# Altium PCB PCB_Design.PcbDoc
Units mm, origin at the board's own origin, x right, y up, seen from the top; angles counter-clockwise.
Board outline 210 x 7 mm, 2 copper layers (Top Layer, Bottom Layer); 59 components, 51 nets, 211 pads, 38 vias.
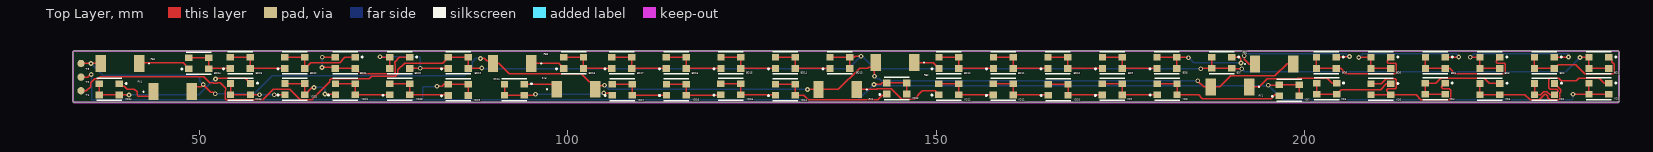
[diagram p0: Top Layer view]
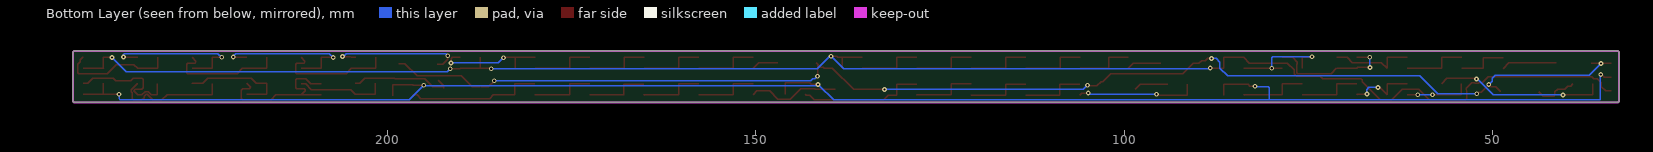
[diagram p1: Bottom Layer view, seen from below]
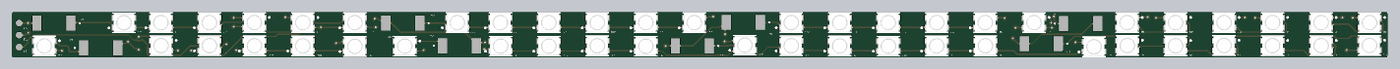
[diagram p2: 3D render of the assembled board from above, using the file's embedded part models]

## Layer stack, top to bottom
Top Solder: solder mask 0.0102, Solder Resist, Dk 3.5
Top Layer: signal copper 0.0356
Dielectric 1: dielectric 0.32, FR-4, Dk 4.8
Bottom Layer: signal copper 0.0356
Bottom Solder: solder mask 0.0102, Solder Resist, Dk 3.5

## Board outline
33.02,82.789 cw(c33.02,83.043) 32.766,83.043 32.766,89.535 cw(c33.02,89.535) 33.02,89.789 242.512,89.789 cw(c242.512,89.535) 242.766,89.535 242.766,83.043 cw(c242.512,83.043) 242.512,82.789

## Design rules (kind name [scope] priority, off if disabled: settings)
AcuteAngle [All] p1: minimum=6.00000000000000E+0001 checktracksonly=FALSE
BoardOutlineClearance "BoardOutlineClearance Overlay" [OnLayer('Top Overlay') or OnLayer('Bottom Overlay')] p1: gap=-2 ignorepadtopadclearanceinfootprint=FALSE
BoardOutlineClearance "BoardOutlineClearance general" [All] p2: gap=0.25 ignorepadtopadclearanceinfootprint=FALSE
Clearance "Clearance TS-LV without coating" [InNetClass('TS') vs InNetClass('LV')] p1 off: gap=20 ignorepadtopadclearanceinfootprint=TRUE except(0: Arc-Text Track-Text SMDPad-Text THPad-Text Via-Text Fill-Text Poly-Text Region-Text Text-Text Text-Hole) // without Conformal Coating (Rules 2023.1.0: EV 4.3.6)
Clearance "Clearance TS-LV" [InNetClass('TS') vs InNetClass('LV')] p2: gap=4.15 ignorepadtopadclearanceinfootprint=TRUE except(0: Arc-Text Track-Text SMDPad-Text THPad-Text Via-Text Fill-Text Poly-Text Region-Text Text-Text)
Clearance "Clearance TS-TS" [InNetClass('TS+') vs InNetClass('TS-')] p3: gap=3.15 ignorepadtopadclearanceinfootprint=TRUE except(0: Arc-Text Track-Text SMDPad-Text THPad-Text Via-Text Fill-Text Poly-Text Region-Text Text-Text)
Clearance "Clearance general" [All] p4: gap=0.15 ignorepadtopadclearanceinfootprint=TRUE except(0: Arc-Text Track-Text SMDPad-Text THPad-Text Via-Text Text-Text)
ComponentClearance [All] p1: gap=0.1 collisioncheckmode=3 verticalgap=1 showdistances=FALSE donotcheckwithout3dbody=TRUE
Creepage [InNetClass('TS') vs InNetClass('LV')] p1: checkdistance=5 applytopolygonpour=TRUE // Kriechstrecke
DiffPairsRouting [All] p1: maxlimit=0.5 minlimit=0.15 mostfreqgap=0.2 toplayer_minwidth=0.15 toplayer_maxwidth=0.5 toplayer_prefwidth=0.2 bottomlayer_minwidth=0.15 bottomlayer_maxwidth=0.5 bottomlayer_prefwidth=0.2 maxuncoupledlength=12.7
Height [All] p1: minheight=0 maxheight=100 prefheight=15
HoleSize [All] p1: absolutevalues=TRUE maxlimit=5 minlimit=0.25 maxpercent=80.000 minpercent=20.000
HoleToHoleClearance [All] p1: gap=0.5 allowstackedmicrovias=FALSE
MinimumAnnularRing [All] p1: minimumring=0.175
MinimumSolderMaskSliver [All] p1: minsoldermaskwidth=0.15
PasteMaskExpansion "PasteMaskExpansion THT" [OnMultiLayer] p1: expansion=-2539.975 usepaste=FALSE // THT-parts without paste
PasteMaskExpansion [All] p2: expansion=0 percent=10.000000
PlaneClearance [All] p1: clearance=0.5
PlaneConnect [All] p1: planeconnectstyle=Relief reliefexpansion=0.5 reliefentries=4 reliefconductorwidth=0.25 reliefairgap=0.15
PolygonConnect "PolygonConnect Stitching Via" [IsStitchingVia] p1: connectstyle=Direct reliefconductorwidth=0.254 reliefentries=4 polygonreliefangle="90 Angle" airgapwidth=0.254
PolygonConnect "PolygonConnect general" [All] p2: thpad.connectstyle=Relief thpad.reliefconductorwidth=0.25 thpad.reliefentries=4 thpad.polygonreliefangle="45 Angle" thpad.airgapwidth=0.2 smdpad.connectstyle=Relief smdpad.reliefconductorwidth=0.25 smdpad.reliefentries=4 smdpad.polygonreliefangle="90 Angle" smdpad.airgapwidth=0.2 via.connectstyle=Relief via.reliefconductorwidth=0.25 via.reliefentries=4 via.polygonreliefangle="45 Angle" via.airgapwidth=0.2
RoutingCorners [All] p1: cornerstyle=45-Degree minsetback=2.5 maxsetback=2.5
RoutingTopology "RoutingTopology Top" [OnLayer('Top Layer')] p1: topology=Vertical // Helplines top-layer
RoutingTopology "RoutingTopology Bottom" [OnLayer('Bottom Layer')] p2: topology=Horizontal // Helplines bottom-layer
RoutingVias "RoutingVias StitchingVias" [IsStitchingVia] p1: holewidth=0.3 width=0.65 viastyle="Through Hole" minholewidth=0.25 minwidth=0.6 maxholewidth=0.3 maxwidth=0.65
RoutingVias "RoutingVias general" [All] p2: holewidth=0.3 width=0.65 viastyle="Through Hole" minholewidth=0.25 minwidth=0.6 maxholewidth=0.6 maxwidth=0.85
SMDToCorner [All] p1: distance=39370
SilkToSilkClearance [All] p1: silktosilkclearance=0
SilkToSolderMaskClearance [IsPad] p1: minsilkscreentomaskgap=0.1 clearancetoexposedcopper=FALSE
SolderMaskExpansion "SolderMaskExpansion Vias" [IsVia] p1: expansion=0.1 istentingtop=TRUE // vias tented
SolderMaskExpansion "SolderMaskExpansion general" [All] p2: expansion=0.1 istentingtop=FALSE
SupplyNets "Schematic Supply Nets" [InNet('GND')] p1: voltage=0.000
UnRoutedNet [All] p1: checkbadconnections=TRUE
Width "Width Powerlane" [InNetClass('Power')] p1: maxlimit=5 minlimit=0.15 preferedwidth=0.5
Width "Width general" [All] p2: maxlimit=3 minlimit=0.15 preferedwidth=0.2
16 further rules are at their usual default settings.

## Components (designator, comment, footprint, x,y, rotation, side; value= is the part's Value field where it differs from the comment)
BD1 "Blue, 3.2V, 120°" "WL-SMTW_3528_LPCC 4" 240.03,88.16 r180 top
BD2 "Blue, 3.2V, 120°" "WL-SMTW_3528_LPCC 4" 232.627,88.16 r180 top
BD3 "Blue, 3.2V, 120°" "WL-SMTW_3528_LPCC 4" 225.224,88.16 r180 top
BD4 "Blue, 3.2V, 120°" "WL-SMTW_3528_LPCC 4" 217.821,88.16 r180 top
BD5 "Blue, 3.2V, 120°" "WL-SMTW_3528_LPCC 4" 210.417,88.16 r180 top
BD6 "Blue, 3.2V, 120°" "WL-SMTW_3528_LPCC 4" 203.014,88.16 r180 top
BD7 "Blue, 3.2V, 120°" "WL-SMTW_3528_LPCC 4" 188.798,88.163 r180 top
BD8 "Blue, 3.2V, 120°" "WL-SMTW_3528_LPCC 4" 181.355,88.16 r0 top
BD9 "Blue, 3.2V, 120°" "WL-SMTW_3528_LPCC 4" 173.952,88.16 r0 top
BD10 "Blue, 3.2V, 120°" "WL-SMTW_3528_LPCC 4" 166.548,88.16 r0 top
BD11 "Blue, 3.2V, 120°" "WL-SMTW_3528_LPCC 4" 159.145,88.16 r0 top
BD12 "Blue, 3.2V, 120°" "WL-SMTW_3528_LPCC 4" 151.742,88.16 r0 top
BD13 "Blue, 3.2V, 120°" "WL-SMTW_3528_LPCC 4" 136.936,88.16 r0 top
BD14 "Blue, 3.2V, 120°" "WL-SMTW_3528_LPCC 4" 129.533,88.16 r0 top
BD15 "Blue, 3.2V, 120°" "WL-SMTW_3528_LPCC 4" 122.13,88.16 r0 top
BD16 "Blue, 3.2V, 120°" "WL-SMTW_3528_LPCC 4" 114.726,88.16 r0 top
BD17 "Blue, 3.2V, 120°" "WL-SMTW_3528_LPCC 4" 107.323,88.16 r0 top
BD18 "Blue, 3.2V, 120°" "WL-SMTW_3528_LPCC 4" 100.758,88.16 r0 top
BD19 "Blue, 3.2V, 120°" "WL-SMTW_3528_LPCC 4" 85.114,88.16 r0 top
BD20 "Blue, 3.2V, 120°" "WL-SMTW_3528_LPCC 4" 77.161,88.16 r180 top
BD21 "Blue, 3.2V, 120°" "WL-SMTW_3528_LPCC 4" 69.757,88.16 r180 top
BD22 "Blue, 3.2V, 120°" "WL-SMTW_3528_LPCC 4" 62.904,88.16 r0 top
BD23 "Blue, 3.2V, 120°" "WL-SMTW_3528_LPCC 4" 55.501,88.16 r0 top
BD24 "Blue, 3.2V, 120°" "WL-SMTW_3528_LPCC 4" 49.86,88.138 r0 top
RB1 "Resistor" "2010 (5025)" 195.91,88.011 r0 top value=#NAME?
RB2 "Resistor" "2010 (5025)" 144.424,88.214 r180 top value=#NAME?
RB3 "Resistor" "2010 (5025)" 92.431,88.087 r180 top value=#NAME?
RB4 "Resistor" "2010 (5025)" 39.157,88.087 r180 top value=#NAME?
RY1 "Resistor" "2010 (5025)" 189.925,84.912 r180 top value=#NAME?
RY2 "Resistor" "2010 (5025)" 136.643,84.557 r180 top value=#NAME?
RY3 "Resistor" "2010 (5025)" 101.092,84.582 r0 top value=#NAME?
RY4 "Resistor" "2010 (5025)" 46.304,84.252 r0 top value=#NAME?
T1 "Testpoint_1" Testpoint_1mm 33.858,84.379 r0 top
T2 "Testpoint_2" Testpoint_1mm 33.858,86.233 r0 top
T3 "Testpoint_3" Testpoint_1mm 33.858,88.087 r0 top
YD1 "Yellow, 2.4V, 120°" "WL-SMTW_3528_LPCC 4" 240.026,84.645 r180 top
YD2 "Yellow, 2.4V, 120°" "WL-SMTW_3528_LPCC 4" 232.639,84.607 r180 top
YD3 "Yellow, 2.4V, 120°" "WL-SMTW_3528_LPCC 4" 225.222,84.607 r180 top
YD4 "Yellow, 2.4V, 120°" "WL-SMTW_3528_LPCC 4" 217.805,84.633 r180 top
YD5 "Yellow, 2.4V, 120°" "WL-SMTW_3528_LPCC 4" 210.414,84.582 r180 top
YD6 "Yellow, 2.4V, 120°" "WL-SMTW_3528_LPCC 4" 203.048,84.633 r180 top
YD7 "Yellow, 2.4V, 120°" "WL-SMTW_3528_LPCC 4" 197.968,84.43 r0 top
YD8 "Yellow, 2.4V, 120°" "WL-SMTW_3528_LPCC 4" 181.381,84.582 r0 top
YD9 "Yellow, 2.4V, 120°" "WL-SMTW_3528_LPCC 4" 173.939,84.557 r0 top
YD10 "Yellow, 2.4V, 120°" "WL-SMTW_3528_LPCC 4" 166.573,84.531 r0 top
YD11 "Yellow, 2.4V, 120°" "WL-SMTW_3528_LPCC 4" 159.131,84.557 r0 top
YD12 "Yellow, 2.4V, 120°" "WL-SMTW_3528_LPCC 4" 151.736,84.595 r0 top
YD13 "Yellow, 2.4V, 120°" "WL-SMTW_3528_LPCC 4" 144.653,84.684 r0 top
YD14 "Yellow, 2.4V, 120°" "WL-SMTW_3528_LPCC 4" 129.536,84.519 r0 top
YD15 "Yellow, 2.4V, 120°" "WL-SMTW_3528_LPCC 4" 122.123,84.582 r0 top
YD16 "Yellow, 2.4V, 120°" "WL-SMTW_3528_LPCC 4" 114.732,84.531 r0 top
YD17 "Yellow, 2.4V, 120°" "WL-SMTW_3528_LPCC 4" 107.366,84.531 r0 top
YD18 "Yellow, 2.4V, 120°" "WL-SMTW_3528_LPCC 4" 92.735,84.531 r180 top
YD19 "Yellow, 2.4V, 120°" "WL-SMTW_3528_LPCC 4" 85.112,84.492 r0 top
YD20 "Yellow, 2.4V, 120°" "WL-SMTW_3528_LPCC 4" 77.161,84.57 r0 top
YD21 "Yellow, 2.4V, 120°" "WL-SMTW_3528_LPCC 4" 69.774,84.582 r0 top
YD22 "Yellow, 2.4V, 120°" "WL-SMTW_3528_LPCC 4" 62.916,84.607 r0 top
YD23 "Yellow, 2.4V, 120°" "WL-SMTW_3528_LPCC 4" 55.524,84.607 r180 top
YD24 "Yellow, 2.4V, 120°" "WL-SMTW_3528_LPCC 4" 37.694,84.557 r180 top

## Footprints (in the part's own frame and the unit in brackets; to place one, negate y for a bottom-side part, rotate by r counter-clockwise, add the part's x,y. Pads: shape width x height; smd on the part's side, far side on the other; paste and mask are expansions set on the pad)
"2010 (5025)" [mm]
  rect 1.4x2.3 smd: 1(-2.6,0) 2(2.6,0)
  silkscreen extent -4,-0.05 -3.9,0.05
Testpoint_1mm [mm] "Testpoint mit einem Durchmesser von 1mm"
  round 1 smd: 1(0,0)
"WL-SMTW_3528_LPCC 4" [mm] "SMD Mono-color TOP LED, body 3.5x2.8mm"
  rect 1x0.9 smd: 1(-1.35,-0.75) 2(1.35,-0.75) 3(1.35,0.75) 4(-1.35,0.75)
  silkscreen extent -2.4,-1.5 1.7,1.5, body extent -1.75,-1.4 1.75,1.4, height 1.86

## Part data
BD1 BD2 BD3 BD4 BD5 BD6 BD7 BD8 BD9 BD10 BD11 BD12 BD13 BD14 BD15 BD16 BD17 BD18 BD19 BD20 BD21 BD22 BD23 BD24: library part 150141BS73140, "WL-SMTW Mono-color TOP LED Waterclear, size 3528, Blue, 3.2V, 120°", Case/Size Code=3528, Emitting Color=Blue, Forward Voltage=3.2V, Manufacturer="Wurth Elektronik", Operating Temperature Max=85°C, Operating Temperature Min=-40°C, Category="Signal LEDs", Chip Technology=InGaN, ComponentLink1Description="Website Link", ComponentLink1URL=https://www.we-online.com/redexpert/article/150141BS73140?ad, ComponentLink2Description="Datasheet Link", ComponentLink2URL=https://www.we-online.com/redexpert/spec/150141BS73140?ad, Dominant Wavelength=470nm, Height=1.85mm, Length=3.5mm, Luminous Intensity=1000mcd, Manufacturer Part Number=150141BS73140, Match Code=WL-SMTW, Mount="Surface Mount", Packaging="Tape and Reel", Peak Wavelength=465nm, Viewing Angle=120°, Width=2.8mm
RB1 RB2 RB3 RB4: library part RES-Std, "General resistor", Resistance=100R, Tolerance=*%
RY1 RY2 RY3 RY4: library part RES-Std, "General resistor", Resistance=220R, Tolerance=*%
T1: "Testpoint"
T2 T3: library part Testpoint_1, "Testpoint"
YD1 YD2 YD3 YD4 YD5 YD6 YD7 YD8 YD9 YD10 YD11 YD12 YD13 YD14 YD15 YD16 YD17 YD18 YD19 YD20 YD21 YD22 YD23 YD24: library part 150141YS73140, "WL-SMTW Mono-color TOP LED Waterclear, size 3528, Yellow, 2.4V, 120°", Case/Size Code=3528, Emitting Color=Yellow, Forward Voltage=2.4V, Manufacturer="Wurth Elektronik", Operating Temperature Max=85°C, Operating Temperature Min=-40°C, Category="Signal LEDs", Chip Technology=AlInGaP, ComponentLink1Description="Website Link", ComponentLink1URL=https://www.we-online.com/redexpert/article/150141YS73140?ad, ComponentLink2Description="Datasheet Link", ComponentLink2URL=https://www.we-online.com/redexpert/spec/150141YS73140?ad, Dominant Wavelength=590nm, Height=1.85mm, Length=3.5mm, Luminous Intensity=2000mcd, Manufacturer Part Number=150141YS73140, Match Code=WL-SMTW, Mount="Surface Mount", Packaging="Tape and Reel", Peak Wavelength=592nm, Viewing Angle=120°, Width=2.8mm

## Via types
v1: diameter 0.65, hole 0.3, Top Layer to Bottom Layer, tented both sides, 38 vias

## Nets (pads, with @x,y where several pads share a name; then routed paths per layer and width w, separated by ;. In a path a pad name is that pad's centre, name@x,y a point inside that pad or via, vN(x,y) a via of type N, cw(c..) or ccw(c..) an arc to the next point about the centre after c; other vN are vias at no path point)
BLUE_LED_IN: BD1.2 BD1.3 BD1.4 BD7.2 BD7.3 BD7.4 BD13.2 BD13.3 BD13.4 BD19.2 BD19.3 BD19.4 T1.1 | length 227.8
  Top Layer w0.2: T1.1 34.595,84.379 35.167,84.951 35.167,85.434 35.74,86.007 36.223,86.007 36.473,86.257 50.522,86.257 51.333,85.446 51.841,85.446 51.883,85.404 52.359,85.404 52.401,85.446 52.783,85.446 53.538,84.69 53.538,84.525 53.424,84.411 53.424,83.304 53.571,83.157 58.57,83.157 59.97,84.557 62.216,84.557 63.634,83.139 65.207,83.139 67.674,85.606 67.674,85.886 67.82,86.032 73.027,86.032 73.355,86.36 76.559,86.36 76.911,86.712 76.911,87.207 77.814,88.11 82.964,88.11 BD19.4 BD19.3 BD19.2 86.506,87.452 v1(88.29,87.452) ; BD13.4 BD13.3 ; BD13.2@138.236,87.41 BD13.2 BD13.3 ; v1(139.802,89.078) 139.053,89.078 138.886,88.91 BD13.3 ; v1(185.953,87.376) 185.991,87.413 BD7.3 ; BD7.2 BD7.3 ; v1(191.524,87.371) 190.191,87.371 BD7.4 BD7.3 ; v1(237.465,88.9) 237.475,88.91 BD1.2 BD1.3 ; BD1.3@238.601,87.49 BD1.3 ; BD1.4 BD1.3
  Bottom Layer w0.2: v1(88.29,87.452) 88.367,87.376 138.1,87.376 v1(139.802,89.078) 139.954,89.078 141.656,87.376 v1(185.953,87.376) ; v1(191.524,87.371) 191.925,86.97 235.534,86.97 v1(237.465,88.9)
GND: RB1.2 RB2.2 RB3.2 RB4.2 RY1.2 RY2.2 RY3.2 RY4.2 T3.1 | length 179.3
  Top Layer w0.2: T3.1 v1(35.208,88.087) RB4.2 ; RY4.2 48.904,84.316 49.504,84.916 50.169,84.916 v1(50.47,85.217) 51.511,84.176 51.902,84.176 52.095,83.982 v1(52.095,83.972) ; v1(88.138,88.773) 88.646,88.773 88.948,88.471 89.447,88.471 RB3.2 90.631,88.087 92.031,86.687 101.832,86.687 102.887,85.632 103.092,85.632 103.692,85.032 104.895,85.032 v1(104.978,85.115) ; v1(132.543,84.557) RY2.2 136.736,84.557 139.623,87.443 140.733,87.443 140.868,87.579 141.224,87.579 141.824,88.179 RB2.2 ; v1(141.63,86.36) RB2.2@141.63,87.868 ; v1(185.547,85.75) 185.547,85.7 186.334,84.912 RY1.2 ; RY1.2@187.425,84.912 188.519,84.912 189.992,86.385 196.034,86.385 197.685,88.036 RB1.2@198.485,88.036
  Bottom Layer w0.2: v1(35.208,88.087) 36.782,86.512 49.581,86.512 49.982,86.111 49.982,85.705 v1(50.47,85.217) ; v1(52.095,83.972) 57.418,83.972 59.836,86.39 85.908,86.39 86.98,87.462 86.98,88.25 87.503,88.773 v1(88.138,88.773) ; v1(104.978,85.115) 105.537,84.557 v1(132.543,84.557) ; v1(141.63,86.36) 141.978,86.012 142.308,86.012 142.57,85.75 v1(185.547,85.75)
NetBD1_1: BD1.1 BD2.2 BD2.3 BD2.4 | length 15.5
  Top Layer w0.2: BD2.2 BD2.3 BD2.4 234.498,87.931 236.856,87.931 238.076,86.71 241.984,86.71 242.13,86.857 242.13,87.964 241.769,88.325 241.769,88.56 241.419,88.91 BD1.1
NetBD2_1: BD2.1 BD3.2 BD3.3 BD3.4 | length 21.5
  Top Layer w0.2: v1(222.555,88.925) 222.58,88.925 222.595,88.91 BD3.2 BD3.3 BD3.4 ; BD2.1 234.017,88.951 v1(235.89,88.951)
  Bottom Layer w0.2: v1(222.555,88.925) 223.068,89.439 235.798,89.439 235.915,89.322 235.915,88.976 v1(235.89,88.951)
NetBD3_1: BD3.1 BD4.2 BD4.3 BD4.4 | length 16.1
  Top Layer w0.2: BD4.2 BD4.3 BD4.4 219.771,87.41 220.471,86.71 227.177,86.71 227.324,86.857 227.324,87.964 227.177,88.11 226.167,88.11 226.053,88.224 226.053,88.389 BD3.1
NetBD4_1: BD4.1 BD5.2 BD5.3 BD5.4 | length 21.8
  Top Layer w0.2: v1(207.416,88.9) 207.427,88.91 BD5.2 BD5.3 BD5.4 ; BD4.1 219.211,88.951 v1(221.005,88.951)
  Bottom Layer w0.2: v1(207.416,88.9) 207.955,89.439 220.639,89.439 221.005,89.073 v1(221.005,88.951)
NetBD5_1: BD5.1 BD6.2 BD6.3 BD6.4 | length 16.1
  Top Layer w0.2: BD6.2 BD6.3 BD6.4 204.964,87.41 205.664,86.71 212.371,86.71 212.517,86.857 212.517,87.964 212.371,88.11 211.36,88.11 211.247,88.224 211.247,88.389 BD5.1
NetBD6_1: BD6.1 RB1.1 | length 18.6
  Top Layer w0.2: v1(191.844,89.13) 191.844,88.674 192.507,88.011 RB1.1 ; BD6.1 204.964,88.91 205.081,89.027 v1(206.146,89.027)
  Bottom Layer w0.2: v1(191.844,89.13) 192.153,89.439 205.664,89.439 206.076,89.027 v1(206.146,89.027)
NetBD7_1: BD7.1 BD8.2 BD8.3 BD8.4 | length 15.1
  Top Layer w0.2: BD8.4 BD8.3 ; BD8.2 BD8.3 ; v1(184.302,88.875) 184.267,88.91 BD8.3 ; BD7.1 191.248,88.913 191.414,88.747 v1(191.414,88.163)
  Bottom Layer w0.2: v1(184.302,88.875) 185.014,88.163 v1(191.414,88.163)
NetBD8_1: BD8.1 BD9.2 BD9.3 BD9.4 | length 8.9
  Top Layer w0.2: BD9.4 BD9.3 BD9.2 BD8.1
NetBD9_1: BD9.1 BD10.2 BD10.3 BD10.4 | length 8.9
  Top Layer w0.2: BD10.4 BD10.3 BD10.2 BD9.1
NetBD10_1: BD10.1 BD11.2 BD11.3 BD11.4 | length 8.9
  Top Layer w0.2: BD11.4 BD11.3 160.452,88.867 160.452,87.76 160.495,87.717 BD11.2 BD10.1
NetBD11_1: BD11.1 BD12.2 BD12.3 BD12.4 | length 8.9
  Top Layer w0.2: BD12.4 BD12.3 BD12.2 BD11.1
NetBD12_1: BD12.1 RB2.1 | length 3.7
  Top Layer w0.2: RB2.1 149.588,88.214 BD12.1
NetBD13_1: BD13.1 BD14.2 BD14.3 BD14.4 | length 8.9
  Top Layer w0.2: BD14.4 BD14.3 BD14.2 BD13.1
NetBD14_1: BD14.1 BD15.2 BD15.3 BD15.4 | length 8.9
  Top Layer w0.2: BD15.4 BD15.3 BD15.2 BD14.1
NetBD15_1: BD15.1 BD16.2 BD16.3 BD16.4 | length 8.9
  Top Layer w0.2: BD16.4 BD16.3 BD16.2 BD15.1
NetBD16_1: BD16.1 BD17.2 BD17.3 BD17.4 | length 8.9
  Top Layer w0.2: BD17.4 BD17.3 BD17.2 BD16.1
NetBD17_1: BD17.1 BD18.2 BD18.3 BD18.4 | length 8.1
  Top Layer w0.2: BD18.4 BD18.3 BD18.2 BD17.1
NetBD18_1: BD18.1 RB3.1 | length 4.7
  Top Layer w0.2: RB3.1 98.731,88.087 BD18.1
NetBD19_1: BD19.1 BD20.2 BD20.3 BD20.4 | length 15.1
  Top Layer w0.2: v1(74.473,89.002) 74.564,88.91 BD20.2 BD20.3 ; BD20.4 BD19.1
  Bottom Layer w0.2: v1(74.473,89.002) 79.817,89.002 79.934,88.884 v1(79.934,87.427)
NetBD20_1: BD20.1 BD21.2 BD21.3 BD21.4 | length 17.3
  Top Layer w0.2: v1(66.599,87.554) 68.264,87.554 BD21.3 BD21.4 ; v1(66.624,88.925) 66.639,88.91 BD21.2 ; BD21.4@71.157,87.41 71.857,86.71 76.414,86.71 76.561,86.857 76.561,87.964 76.447,88.077 76.447,88.243 77.114,88.91 BD20.1
  Bottom Layer w0.2: v1(66.599,87.554) 66.599,88.9 v1(66.624,88.925)
NetBD21_1: BD21.1 BD22.2 BD22.3 BD22.4 | length 11.7
  Top Layer w0.2: BD22.4 BD22.3 BD22.2 65.054,88.21 69.011,88.21 69.711,88.91 BD21.1
NetBD22_1: BD22.1 BD23.2 BD23.3 BD23.4 | length 8.9
  Top Layer w0.2: BD23.4 BD23.3 BD23.2 BD22.1
NetBD23_1: BD23.1 BD24.2 BD24.3 BD24.4 | length 7.1
  Top Layer w0.2: BD24.4 BD24.3 51.21,87.41 BD23.1
NetBD24_1: BD24.1 RB4.1 | length 7.5
  Top Layer w0.2: RB4.1@41.284,88.163 47.735,88.163 BD24.1
NetRY1_1: RY1.1 YD6.1 | length 14
  Top Layer w0.2: RY1.1@192.423,84.734 192.423,85.083 RY1.1@193.125,85.784 ; RY1.1 193.875,84.912 194.998,86.035 199.024,86.035 199.072,86.083 203.098,86.083 203.798,85.383 YD6.1
NetRY2_1: RY2.1 YD12.1 | length 12.4
  Top Layer w0.2: RY2.1 141.936,84.557 142.013,84.634 143.907,84.634 145.307,83.234 147.02,83.234 148.152,84.366 149.865,84.366 YD12.1
NetRY3_1: RY3.1 YD18.1 | length 4.7
  Top Layer w0.2: YD18.1 97.793,85.281 RY3.1
NetRY4_1: RY4.1 YD24.1 | length 5.9
  Top Layer w0.2: YD24.1 39.336,85.014 39.725,85.014 40.157,84.582 41.124,84.582 41.478,84.228 41.478,83.759 41.595,83.642 43.095,83.642 RY4.1
NetYD1_1: YD1.1 YD2.2 YD2.3 YD2.4 | length 16.6
  Top Layer w0.2: YD2.2 YD2.3 232.097,83.857 232.515,84.275 232.971,84.275 233.389,83.857 YD2.4 234.509,84.378 234.296,84.591 233.451,84.591 233.239,84.804 233.239,85.911 233.385,86.057 234.592,86.057 234.917,85.733 236.917,85.733 237.279,86.095 240.076,86.095 240.776,85.395 YD1.1
NetYD2_1: YD2.1 YD3.2 YD3.3 YD3.4 | length 16
  Top Layer w0.2: YD3.2 YD3.3 YD3.4 229.985,83.857 230.685,83.157 231.892,83.157 232.66,83.925 232.826,83.925 233.105,83.646 233.105,83.437 233.385,83.157 234.592,83.157 234.739,83.304 234.739,84.112 234.859,84.233 234.859,84.523 234.739,84.644 234.739,84.657 234.039,85.357 YD2.1
NetYD3_1: YD3.1 YD4.2 YD4.3 YD4.4 | length 14.9
  Top Layer w0.2: YD4.4 YD4.3 YD4.2 217.851,85.383 218.551,86.083 224.45,86.083 225.15,85.383 226.546,85.383 YD3.1
NetYD4_1: YD4.1 YD5.2 YD5.3 YD5.4 | length 21.6
  Top Layer w0.2: YD5.3 YD5.4 ; YD5.2 210.46,85.332 211.16,86.032 212.367,86.032 212.514,85.886 212.514,84.778 212.367,84.632 211.356,84.632 211.243,84.518 211.243,84.353 YD5.4 ; YD4.1 218.634,84.862 218.847,84.649 219.692,84.649 219.905,84.436 219.905,83.329 219.759,83.183 215.851,83.183 215.202,83.832 YD5.4
NetYD5_1: YD5.1 YD6.2 YD6.3 YD6.4 | length 12.2
  Top Layer w0.2: YD6.2 YD6.3 YD6.4 205.047,84.532 210.364,84.532 211.164,85.332 YD5.1
NetYD7_1: YD7.1 YD8.2 YD8.3 YD8.4 | length 18.6
  Top Layer w0.2: YD8.4 YD8.3 YD8.2 185.659,83.832 186.182,83.309 195.495,83.309 196.018,83.832 196.465,83.832 YD7.1
NetYD8_1: YD8.1 YD9.2 YD9.3 YD9.4 | length 9
  Top Layer w0.2: YD9.4 YD9.3 YD9.2 180.006,83.807 YD8.1
NetYD9_1: YD9.1 YD10.2 YD10.3 YD10.4 | length 8.9
  Top Layer w0.2: YD10.4 YD10.3 YD10.2 167.949,83.807 YD9.1
NetYD10_1: YD10.1 YD11.2 YD11.3 YD11.4 | length 9
  Top Layer w0.2: YD11.4 YD11.3 YD11.2 165.198,83.807 YD10.1
NetYD11_1: YD11.1 YD12.2 YD12.3 YD12.4 | length 8.9
  Top Layer w0.2: YD12.4 YD12.3 YD12.2 157.742,83.845 YD11.1
NetYD13_1: YD13.1 YD14.2 YD14.3 YD14.4 | length 17.2
  Top Layer w0.2: YD14.4 YD14.3 YD14.2 132.029,83.769 132.642,83.157 142.09,83.157 142.703,83.769 143.139,83.769 YD13.1
NetYD14_1: YD14.1 YD15.2 YD15.3 YD15.4 | length 8.9
  Top Layer w0.2: YD15.4 YD15.3 YD15.2 128.123,83.832 YD14.1
NetYD15_1: YD15.1 YD16.2 YD16.3 YD16.4 | length 8.9
  Top Layer w0.2: YD16.4 YD16.3 YD16.2 120.722,83.781 YD15.1
NetYD16_1: YD16.1 YD17.2 YD17.3 YD17.4 | length 8.9
  Top Layer w0.2: YD17.4 YD17.3 YD17.2 YD16.1
NetYD17_1: YD17.1 YD18.2 YD18.3 YD18.4 | length 16.4
  Top Layer w0.2: YD18.2 YD18.3 YD18.4 95.414,83.781 95.529,83.896 v1(95.606,83.896) ; v1(104.867,84.074) 105.723,84.074 YD17.1
  Bottom Layer w0.2: v1(95.606,83.896) 104.75,83.896 104.867,84.014 v1(104.867,84.074)
NetYD19_1: YD19.1 YD20.2 YD20.3 YD20.4 | length 9.5
  Top Layer w0.2: YD20.4 YD20.3 YD20.2 83.684,83.82 YD19.1
NetYD20_1: YD20.1 YD21.2 YD21.3 YD21.4 | length 8.9
  Top Layer w0.2: YD21.4 YD21.3 71.095,85.303 71.095,84.912 71.124,84.883 YD21.2 71.136,83.82 YD20.1
NetYD21_1: YD21.1 YD22.2 YD22.3 YD22.4 | length 9.7
  Top Layer w0.2: YD22.4 YD22.3 YD22.2 65.194,84.785 65.456,84.785 v1(65.507,84.836) ; v1(67.005,83.922) 68.334,83.922 YD21.1
  Bottom Layer w0.2: v1(65.507,84.836) 66.751,84.836 67.056,84.531 67.056,84.277 66.936,84.157 66.936,83.991 v1(67.005,83.922)
NetYD22_1: YD22.1 YD23.2 YD23.3 YD23.4 | length 8.8
  Top Layer w0.2: YD23.2 YD23.3 YD23.4 57.949,83.857 v1@57.963,83.871 ; v1(60.122,83.845) 60.134,83.857 YD22.1
  Bottom Layer w0.2: v1(58.096,83.837) 58.104,83.845 v1(60.122,83.845)
NetYD23_1: YD23.1 YD24.2 YD24.3 YD24.4 | length 23.3
  Top Layer w0.2: YD24.2 YD24.3 YD24.4 39.108,83.871 40.335,83.871 v1(40.386,83.82) ; v1(52.121,85.979) 52.199,86.057 56.174,86.057 YD23.1
  Bottom Layer w0.2: v1(40.386,83.82) 49.886,83.82 52.045,85.979 v1(52.121,85.979)
YELLOW_LED_IN: T2.1 YD1.2 YD1.3 YD1.4 YD7.2 YD7.3 YD7.4 YD13.2 YD13.3 YD13.4 YD19.2 YD19.3 YD19.4 | length 236.1
  Top Layer w0.2: T2.1 34.773,86.233 35.128,86.589 v1(35.255,86.589) ; v1(82.22,84.988) 82.908,84.988 83.162,85.242 YD19.4 YD19.3 YD19.2 ; v1(141.58,85.242) 142.512,85.242 142.703,85.434 YD13.4 YD13.3 YD13.2 ; v1(195.123,85.115) 196.553,85.115 YD7.4 YD7.3 YD7.2 ; v1(236.525,83.896) 238.675,83.896 YD1.3 ; YD1.2 YD1.3 ; YD1.4 YD1.3
  Bottom Layer w0.2: v1(35.255,86.589) 35.299,86.545 35.299,83.256 35.416,83.139 80.289,83.139 ; v1@82.156,84.924 v1@82.169,84.938 ; v1@82.22,84.938 v1@82.169,84.938 ; v1(82.22,84.988) v1@82.169,84.938 ; v1(236.525,83.896) 236.499,83.871 236.499,83.277 236.382,83.16 197.079,83.16 v1(195.123,85.115) 195.097,85.09 141.402,85.09 139.451,83.139 80.289,83.139 ; 80.289,83.139 80.289,84.82 80.407,84.938 v1@82.169,84.938

## Keep-outs
Keep-Out Layer:
  the board outline again, w0.254